# Altium PCB GR_Gold.PcbDoc
Units mil, origin at the board's own origin, x right, y up, seen from the top; angles counter-clockwise.
Board outline 2637.8 x 3661.42 mil, 2 copper layers (Top Layer, Bottom Layer); 49 components, 42 nets, 162 pads, 22 vias.
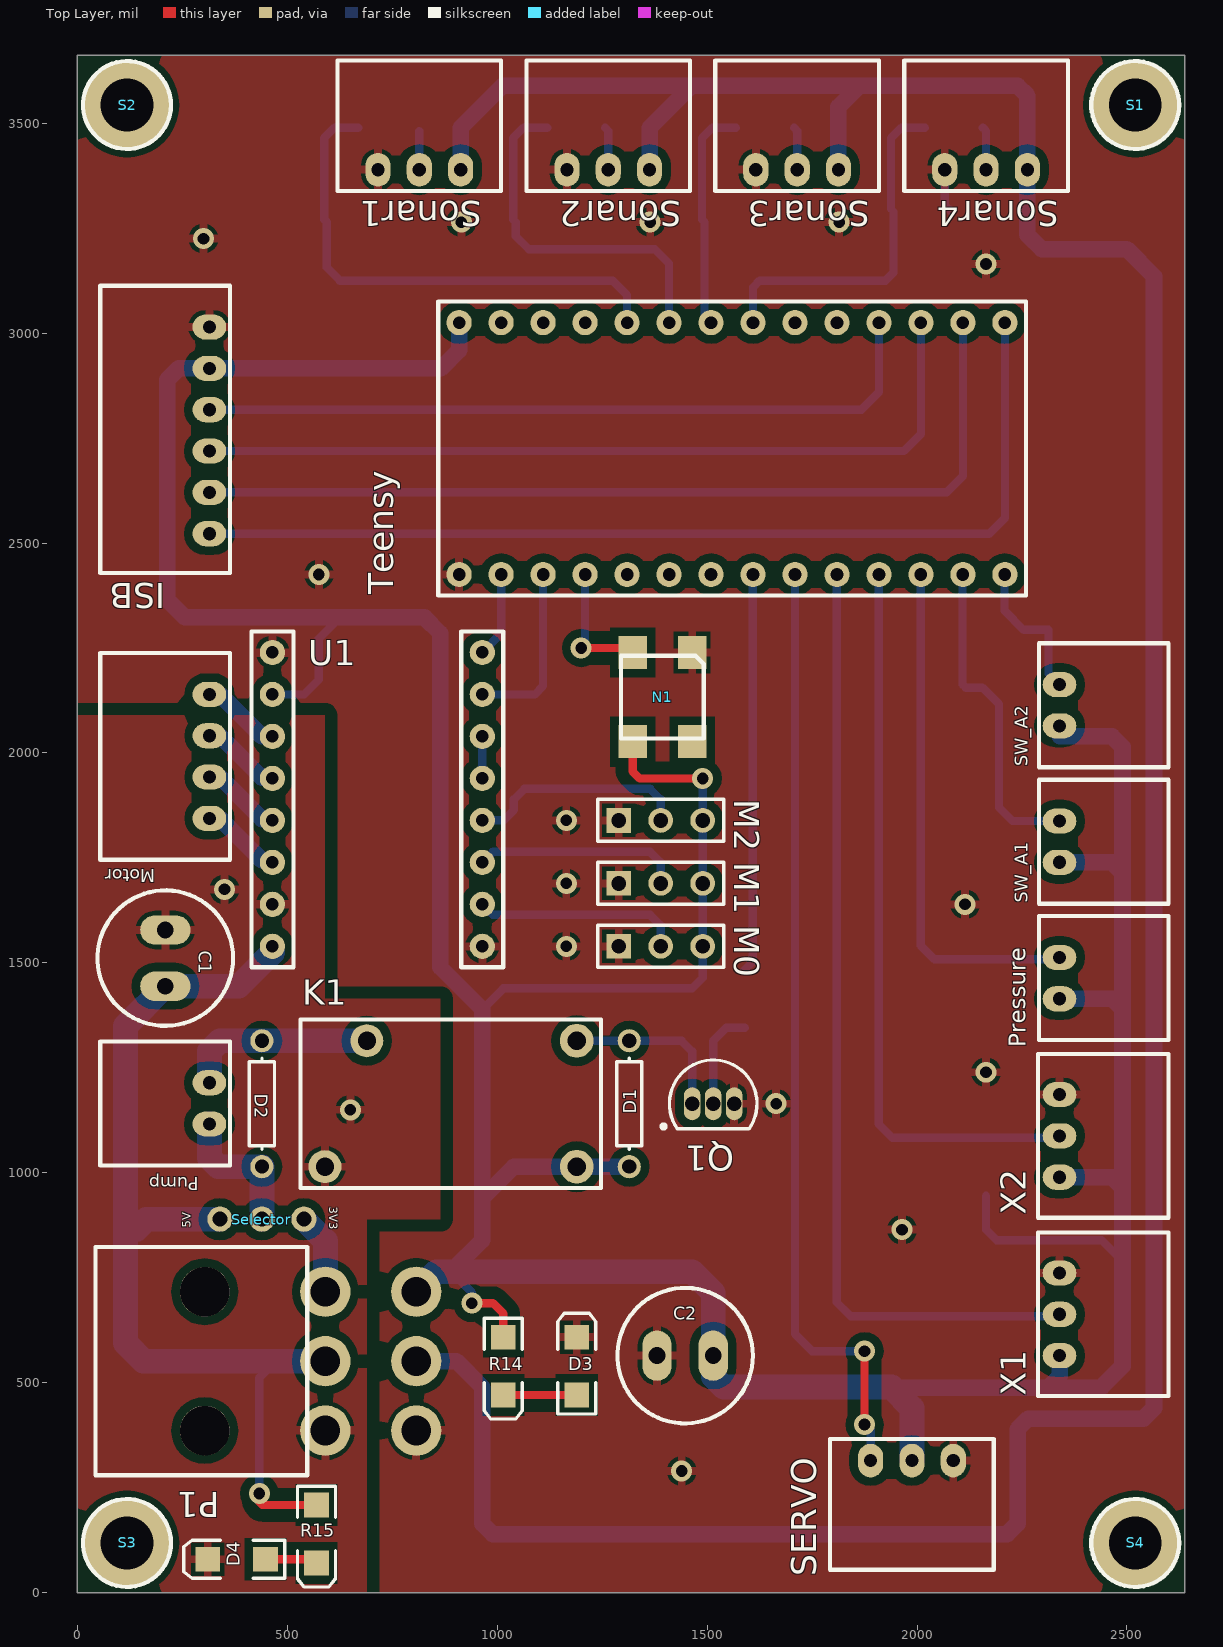
[diagram p0: Top Layer view]
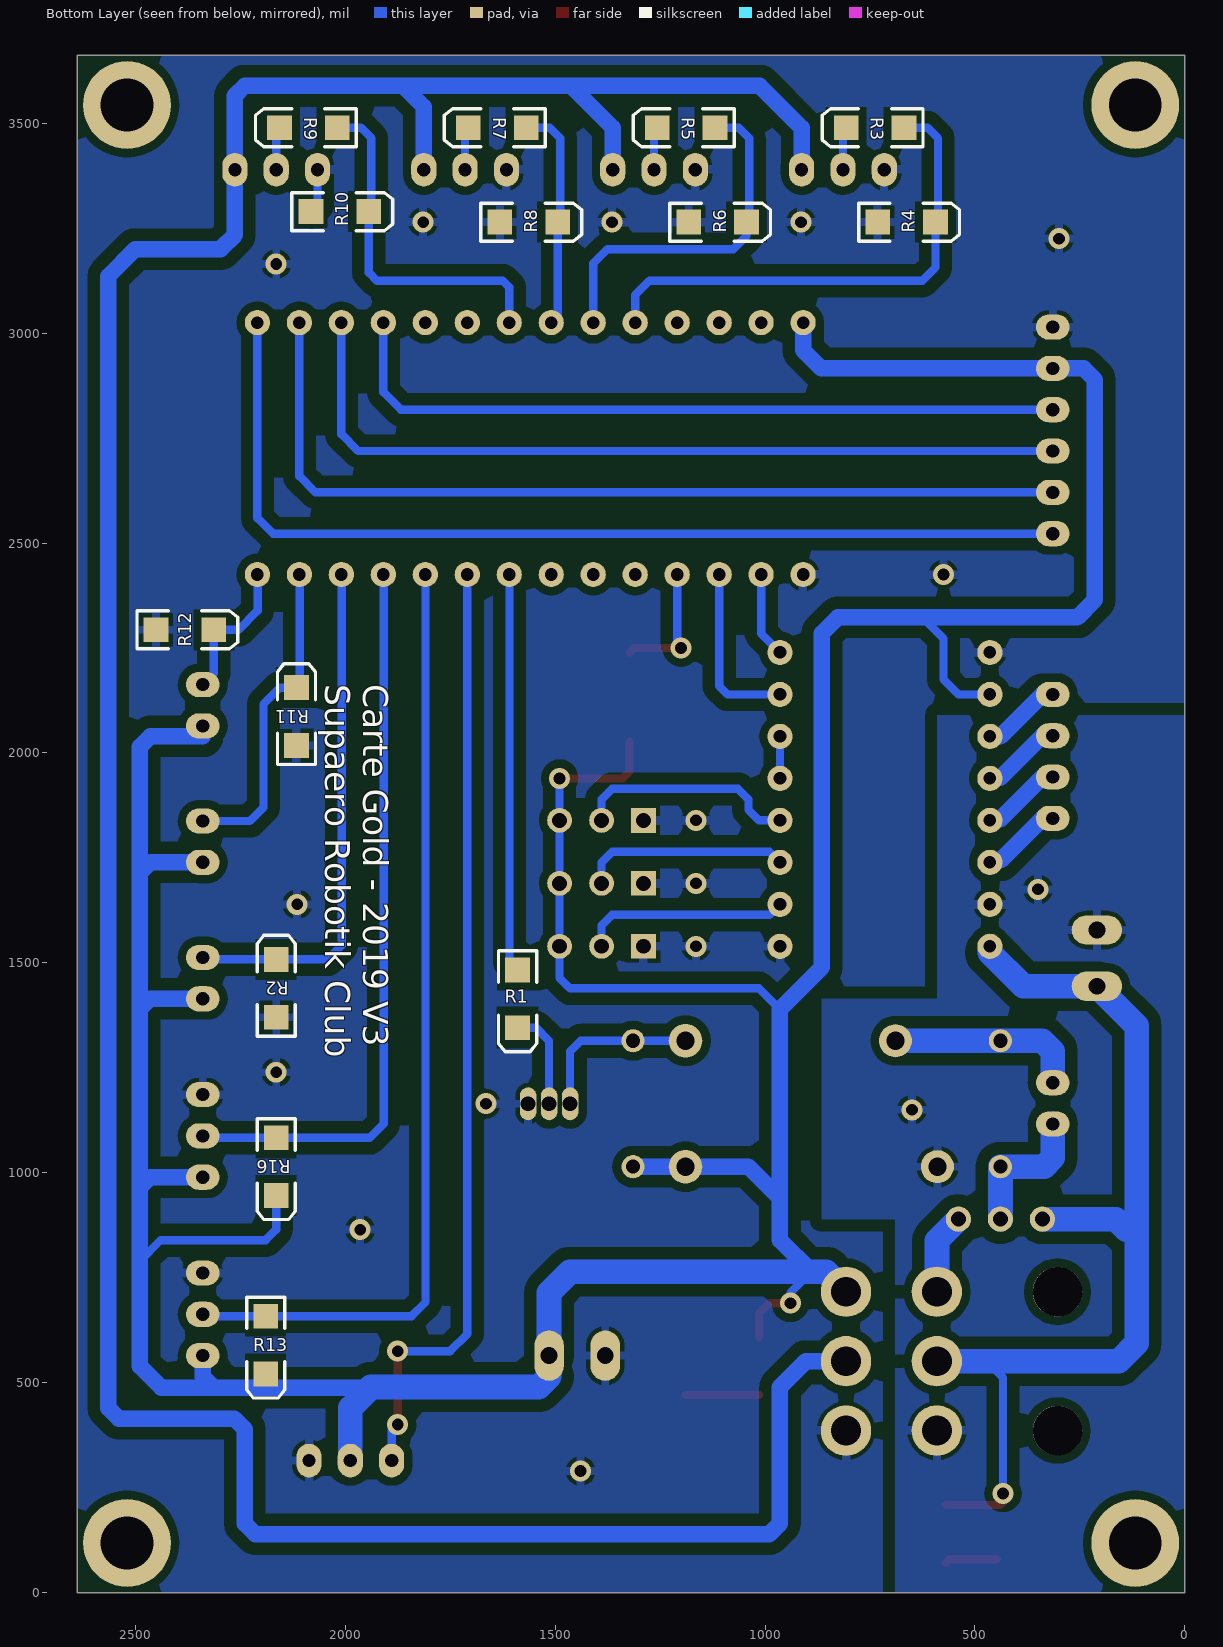
[diagram p1: Bottom Layer view, seen from below]

## Layer stack, top to bottom
Top Solder: solder mask 0.4, Solder Resist, Dk 3.5
Top Layer: signal copper 1.4
Dielectric 1: dielectric 12.6, FR-4, Dk 4.8
Bottom Layer: signal copper 1.4
Bottom Solder: solder mask 0.4, Solder Resist, Dk 3.5

## Board outline
0,0 2637.8,0 2637.8,3661.42 0,3661.42

## Design rules (kind name [scope] priority, off if disabled: settings)
Clearance [All] p1: gap=10 except(20: SMDPad-Poly THPad-Poly Via-Poly; 30: Arc-Poly Track-Poly Fill-Poly Poly-Poly Poly-Region Poly-Text)
PolygonConnect Poly_GNDA [InNet('GND_A')] p1: connectstyle=Relief reliefconductorwidth=20 reliefentries=4 polygonreliefangle="90 Angle" airgapwidth=10
PolygonConnect PolygonConnect_1 [All] p2: connectstyle=Relief reliefconductorwidth=20 reliefentries=4 polygonreliefangle="90 Angle" airgapwidth=10
RoutingVias [All] p1: holewidth=28 width=50 viastyle="Through Hole" minholewidth=28 minwidth=50 maxholewidth=28 maxwidth=50
SolderMaskExpansion [All] p1: expansion=4
Width [All] p1: maxlimit=78.74 minlimit=10 preferedwidth=19.68
30 further rules are at their usual default settings.

## Components (designator, comment, footprint, x,y, rotation, side; value= is the part's Value field where it differs from the comment)
C1 "Cap2" Condensateur 209.37,1444.37 r90 top
C2 "Cap2" Condensateur 1514.37,564.37 r180 top
D1 "Diode" AXIAL-0.3 1314.37,1164.37 r270 top
D2 "Diode" AXIAL-0.3 439.37,1164.37 r270 top
D3 "LED2" 3.2X1.6X1.1 1189.37,539.37 r90 top
D4 "LED2" 3.2X1.6X1.1 379.37,79.37 r180 top
ISB "Header 6H" "MOLEX SPOX 6X1H" 314.37,3014.37 r270 top
K1 "Relay-SPST" Relay 889.37,1164.37 r270 top
M0 "Header 3" HDR1X3 1289.37,1539.37 r0 top
M1 "Header 3" HDR1X3 1289.37,1689.37 r0 top
M2 "Header 3" HDR1X3 1289.37,1839.37 r0 top
Motor "Header 4H" "MOLEX SPOX 4X1H" 314.37,2139.37 r270 top (schematic designator Stepper)
N1 "NeoPixel" Neopixel 1464.37,2239.37 r270 top
P1 "Header 3X2H" MOLEX_MINIFITJR_3X2 590.55,551.18 r270 top
Pressure "Header 2H" "Molex SPOX 2x1H" 2339.37,1414.37 r90 top
Pump "Header 2H" "Molex SPOX 2x1H" 314.37,1214.37 r270 top
Q1 "NPN" TO-226-AA 1514.37,1164.37 r270 top
R1 "Res2" 3.2X1.6X1.1 1589.37,1414.37 r270 bottom
R2 "Res2" 3.2X1.6X1.1 2164.37,1439.37 r90 bottom
R3 "Res2" 3.2X1.6X1.1 737.8,3489.37 r0 bottom
R4 "Res2" 3.2X1.6X1.1 662.8,3264.37 r180 bottom
R5 "Res2" 3.2X1.6X1.1 1187.8,3489.37 r0 bottom
R6 "Res2" 3.2X1.6X1.1 1112.8,3264.37 r180 bottom
R7 "Res2" 3.2X1.6X1.1 1637.8,3489.37 r0 bottom
R8 "Res2" 3.2X1.6X1.1 1562.8,3264.37 r180 bottom
R9 "Res2" 3.2X1.6X1.1 2087.8,3489.37 r0 bottom
R10 "Res2" 3.2X1.6X1.1 2012.8,3289.37 r180 bottom
R11 "Res2" 3.2X1.6X1.1 2116.14,2086.61 r90 bottom
R12 "Res2" 3.2X1.6X1.1 2381.89,2293.31 r180 bottom
R13 "Res2" 3.2X1.6X1.1 2189.37,589.37 r270 bottom
R14 "Res2" 3.2X1.6X1.1 1014.37,539.37 r270 top
R15 "Res2" 3.2X1.6X1.1 569.37,139.37 r270 top
R16 "Res2" 3.2X1.6X1.1 2164.37,1014.37 r270 bottom
S1 "Screw M3" "Screw M3" 2519.69,3543.31 r0 top
S2 "Screw M3" "Screw M3" 118.11,3543.31 r0 top
S3 "Screw M3" "Screw M3" 118.11,118.11 r0 top
S4 "Screw M3" "Screw M3" 2519.69,118.11 r0 top
Selector "Voltage Selector" "VOLTAGE SELECTOR" 439.37,889.37 r90 top
SERVO "Header 3H" "Molex SPOX 3x1H" 1889.37,314.37 r0 top
Sonar1 "Header 3H" "Molex SPOX 3x1H" 912.8,3389.37 r180 top
Sonar2 "Header 3H" "Molex SPOX 3x1H" 1362.8,3389.37 r180 top
Sonar3 "Header 3H" "Molex SPOX 3x1H" 1812.8,3389.37 r180 top
Sonar4 "Header 3H" "Molex SPOX 3x1H" 2262.8,3389.37 r180 top
SW_A1 "Header 2H" "Molex SPOX 2x1H" 2339.37,1739.37 r90 top
SW_A2 "Header 2H" "Molex SPOX 2x1H" 2339.37,2064.37 r90 top
Teensy "Teensy 3.2" teensy 1709.21,2325 r90 top
U1 "DRV8825" DRV8825 964.37,1539.37 r180 top locked (schematic designator "Motor Driver")
X1 "Header 3H" "Molex SPOX 3x1H" 2339.37,564.37 r90 top
X2 "Header 3H" "Molex SPOX 3x1H" 2339.37,989.37 r90 top

## Footprints (in the part's own frame and the unit in brackets; to place one, negate y for a bottom-side part, rotate by r counter-clockwise, add the part's x,y. Pads: shape width x height; smd on the part's side, far side on the other; paste and mask are expansions set on the pad)
3.2X1.6X1.1 [mm] "SMT LED; 2 Flat Leads"
  rect 1.5x1.5 smd: 1(-1.75,0) 2(1.75,0)
  silkscreen extent -2.9,-1.15 3.2,1.15
AXIAL-0.3 [mm] "Axial Device, Thru-Hole; 2 Leads; 0.3 in Pin Spacing"
  round 1.4 hole 0.85: 1(-3.81,0) 2(3.81,0)
  silkscreen extent -2.77,-0.76 2.77,0.76
Condensateur [mil]
  oval 70x120 hole 40: 1(0,0) 2(133.86,0)
  silkscreen extent -94,-161 228,161, body extent -93,-160 227,160, height 500
DRV8825 [mil] "Stepper Driver"
  round 60 hole 30: 1(0,0) 2(0,-100) 3(0,-200) 4(0,-300) 5(0,-400) 6(0,-500) 7(0,-600) 8(0,-700) 9(500,-700) 10(500,-600) 11(500,-500) 12(500,-400) 13(500,-300) 14(500,-200) 15(500,-100) 16(500,0)
  silkscreen extent -50,-750 550,50
HDR1X3 [mm] "Connector; Header; 3 Position"
  rect 1.5x1.5 hole 0.9: 1(0,0)
  round 1.5 hole 0.9: 2(2.54,0) 3(5.08,0)
  silkscreen extent -1.27,-1.27 6.35,1.27
"Molex SPOX 2x1H" [mil] "Prise CI, Molex, 3 Contacts, 1 rangée, entraxe 2.5mm, 3A, Coudé, ref 22-03-5035"
  oval 60x80 hole 31.5: 1(0,0) 2(98.43,0)
  silkscreen extent -98,-260 197,49, body extent -98,-262 193,49, height 193
"Molex SPOX 3x1H" [mil] "Prise CI, Molex, 3 Contacts, 1 rangée, entraxe 2.5mm, 3A, Coudé, ref 22-03-5035"
  oval 60x80 hole 31.5: 1(0,0) 2(98.43,0) 3(196.85,0)
  silkscreen extent -96,-260 293,51, body extent -96,-260 293,51, height 193
"MOLEX SPOX 4X1H" [mil] "Prise CI, Molex, 3 Contacts, 1 rangée, entraxe 2.5mm, 3A, Coudé, ref 22-03-5035"
  oval 60x80 hole 31.5: 1(0,0) 2(98.43,0) 3(196.85,0) 4(295.28,0)
  silkscreen extent -98,-260 394,49, body extent -98,-262 390,49, height 193
"MOLEX SPOX 6X1H" [mil] "MOLEX SPOX 6X1H, 22-05-7065"
  oval 60x80 hole 31.5: 1(0,0) 2(98.43,0) 3(196.85,0) 4(295.28,0) 5(393.7,0) 6(492.13,0)
  silkscreen extent -98,-260 586,49, body extent -95,-260 590,51, height 193
MOLEX_MINIFITJR_3X2 [mm] "MOLEX_MINIFITJR_3X2, 39-30-1060"
  round 3.048 hole 1.8: 1(-4.2,5.5) 2(-4.2,0) 3(0,5.5) 4(0,0) 5(4.2,5.5) 6(4.2,0)
  round 3 hole 3 unplated: 10(-4.2,-7.3) 11(4.2,-7.3)
  silkscreen extent -6.9,-13.9 6.9,-1.1, body extent -6.9,-13.9 7.3,6.04, height 11.41
Neopixel [mm]
  rect 2x1.7 smd: 1(0,0) 2(0,-3.6) 3(5.4,-3.6) 4(5.4,0)
  silkscreen extent 0.2,-4.3 5.2,0.7, body extent 0.19,-4.33 5.19,0.67, height 2
Relay [mm] "SPST-NO Relay"
  round 2 hole 1.1: 1(3.81,-7.62) 2(-3.81,-5.08)
  round 2.032 hole 1.1: 3(-3.81,7.62) 4(3.81,7.62)
  silkscreen extent -5.09,-9.09 5.09,9.09, body extent -5.08,-9.14 5.08,9.14, height 15
"Screw M3" [mm] "M3 iso Screw"
  round 5.32 hole 3.2 unplated: 0(0,0)
  silkscreen extent -2.66,-2.66 2.66,2.66
teensy [mil] "Teensy 3.2"
  round 60 hole 30: 0(100,700) 1(100,600) 2(100,500) 3(100,400) 4(100,300) 5(100,200) 6(100,100) 7(100,0) 8(100,-100) 9(100,-200) 10(100,-300) 11(100,-400) 12(100,-500) 13(700,-500) 14(700,-400) 15(700,-300) 16(700,-200) 17(700,-100) 18(700,0) 19(700,100) 20(700,200) 21(700,300) 22(700,400) 23(700,500) 41(700,600) 42(700,700) 43(700,800) 44(100,800)
  silkscreen extent 50,-550 750,850, body extent 48,-550 752,907, height 505
TO-226-AA [mm] "TO, Flat Index; 3 In-Line, Axial Leads; Body Dia. 4.8mm; Leads 0.55 x 0.51 mm (max)"
  oval 2x1 hole 0.9: 1(0,-1.27) 2(0,0) 3(0,1.27)
  silkscreen extent -2.65,-3.13 1.52,2.65, body extent -2.65,-2.66 1.52,2.66, height 5.33
"VOLTAGE SELECTOR" [mil] "3 Pads for Voltage Selection"
  round 60 hole 35.43: 1(0,100) 2(0,-100) 3(0,0)
  body extent -50,-150 50,150, height 340

## Part data
C1 C2: "Capacitor"
D1 D2: "Default Diode"
D3 D4: "Typical RED, GREEN, YELLOW, AMBER GaAs LED"
ISB: "Header, 6-Pin, Right Angle"
K1: "Single-Pole Single-Throw Relay"
M0 M1 M2: "Header, 3-Pin"
Motor: "Header, 4-Pin, Right Angle"
P1: "Header, 3-Pin, Dual row, Right Angle"
Pressure Pump SW_A1 SW_A2: "Header, 2-Pin, Right Angle"
Q1: "NPN Bipolar Transistor"
R1 R2 R3 R4 R5 R6 R7 R8 R9 R10 R11 R12 R13 R14 R15 R16: "Resistor"
Selector: "Selection of voltage by soldering pads"
SERVO Sonar1 Sonar2 Sonar3 Sonar4 X1 X2: "Header, 3-Pin, Right Angle"
Teensy: library part teensy3.2
U1: "Stepper Driver Module"

## Via types
v1: diameter 50, hole 28, Top Layer to Bottom Layer, 22 vias

## Nets (pads, with @x,y where several pads share a name; then routed paths per layer and width w, separated by ;. In a path a pad name is that pad's centre, name@x,y a point inside that pad or via, vN(x,y) a via of type N, cw(c..) or ccw(c..) an arc to the next point about the centre after c; other vN are vias at no path point)
3V3_A: P1.2 Selector.2 | length 194
  Bottom Layer w59.06: Selector.2 590.55,838.19 P1.2
5V_L: C2.1 D1.2 ISB.2 K1.4 M0.3 M1.3 M2.3 N1.3 P1.1 Pressure.1 R13.2 R14.1 R16.2 SERVO.2 SW_A1.1 SW_A2.1 Teensy.43 U1.10 X1.1 X2.1 | length 10569.9
  Top Layer w19.68: v1(939.37,689.37) 989.37,689.37 1014.37,664.37 R14.1 ; N1.3 1322.64,1956.1 1339.37,1939.37 v1(1489.37,1939.37)
  Bottom Layer w19.68: U1.10 539.37,2139.37 575,2175 575,2272.83 625,2322.83 ; 889.37,764.37 939.37,714.37 v1(939.37,689.37) ; 964.37,1389.37 1014.37,1439.37 1464.37,1439.37 1489.37,1464.37 M0.3 M1.3 M2.3 v1(1489.37,1939.37) ; 1939.37,487.8 1939.37,489.37 ; 2014.37,487.8 2014.37,489.37 ; R16.2 2164.37,864.37 2189.37,839.37 2439.37,839.37 2489.37,789.37 ; 2314.37,487.8 2314.37,489.37 ; 2437.8,487.8 2439.37,489.37
  Bottom Layer w39.37: 889.37,764.37 964.37,839.37 964.37,939.37 ; Teensy.43 909.21,2959.21 865.94,2915.94 ISB.2 240.94,2915.94 214.37,2889.37 214.37,2364.37 255.91,2322.83 625,2322.83 826.77,2322.83 864.37,2285.24 864.37,1489.37 964.37,1389.37 964.37,939.37 ; D1.2 K1.4 1039.37,1014.37 964.37,939.37 ; C2.1@1514.37,514.37 C2.1 ; 1939.37,487.8 2014.37,487.8 2314.37,487.8 2437.8,487.8 ; 2314.37,489.37 2339.37,514.37 X1.1 ; X2.1 2464.37,989.37 2489.37,964.37 ; Pressure.1 2464.37,1414.37 2489.37,1389.37 ; SW_A1.1 2464.37,1739.37 2489.37,1714.37 ; SW_A2.1@2339.37,2039.37 2464.37,2039.37 2489.37,2014.37 2489.37,1389.37 ; 2439.37,489.37 2489.37,539.37 2489.37,789.37 2489.37,964.37 ; 2489.37,964.37 2489.37,1389.37
  Bottom Layer w59.06: P1.1 854.92,764.37 889.37,764.37 1464.37,764.37 1514.37,714.37 C2.1 ; C2.1@1514.37,514.37 1539.37,489.37 1939.37,489.37 ; 1939.37,487.8 1987.8,439.37 SERVO.2
12V_A: C1.1 P1.4 R15.1 Selector.1 U1.16 | length 2397
  Top Layer w19.68: v1(433.07,236.22) 433.07,215.67 440.47,208.27 R15.1
  Bottom Layer w19.68: 114.37,864.37 139.37,864.37 ; v1(433.07,236.22) 433.07,511.81 472.44,551.18
  Bottom Layer w59.05: U1.16@464.37,1524.37 384.37,1444.37 C1.1 114.37,1349.37 114.37,864.37 114.37,594.29 157.48,551.18 P1.4@589.37,551.18
  Bottom Layer w59.06: 139.37,864.37 164.37,889.37 Selector.1
15V: P1.3 Sonar1.1 Sonar2.1 Sonar3.1 Sonar4.1 | length 7708.1
  Bottom Layer w39.37: P1.3 902.56,551.18 964.37,489.37 964.37,164.37 989.37,139.37 2214.37,139.37 2239.37,164.37 2239.37,389.37 2264.37,414.37 2539.37,414.37 2564.37,439.37 2564.37,3135.63 2500,3200 2296.85,3200 2262.8,3234.06 Sonar4.1 2262.8,3565.94 2239.37,3589.37 1462.8,3589.37 ; Sonar1.1 912.8,3489.37 1012.8,3589.37 1462.8,3589.37 ; Sonar2.1 1362.8,3489.37 1462.8,3589.37 ; Sonar3.1 1812.8,3539.37 1862.8,3589.37
GND_A: C1.2 D4.2 K1.1 P1.6 U1.15
  other v1: 650,1150 350,1675
GND_L: C2.2 D3.2 ISB.1 M0.1 M1.1 M2.1 N1.1 P1.5 Q1.3 R2.1 R4.1 R6.1 R8.1 R10.1 R11.1 R12.1 SERVO.3 Sonar1.3 Sonar2.3 Sonar3.3 Sonar4.3 Teensy.44 U1.1 U1.9 X1.3 X2.3 | length 106.5
  Bottom Layer w19.68: Sonar4.3 2065.94,3305.12 R10.1
  other v1: 1439.37,289.37 1964.37,864.37 1664.37,1164.37 2164.37,1239.37 1164.37,1539.37 2114.37,1639.37 1164.37,1689.37 1164.37,1839.37 575,2425 2164.37,3164.37 300,3225 914.37,3264.37 1364.37,3264.37 1814.37,3264.37
NetD1_1: D1.1 K1.3 Q1.1 | length 410.4
  Bottom Layer w19.68: K1.3 D1.1 1439.37,1314.37 1464.37,1289.37 Q1.1
NetD2_1: D2.1 K1.2 Pump.1 | length 460.4
  Bottom Layer w59.05: Pump.1 314.37,1289.37 339.37,1314.37 K1.2
NetD2_2: D2.2 Pump.2 Selector.3 | length 339.1
  Bottom Layer w59.06: Pump.2 314.37,1035.63 335.63,1014.37 D2.2 Selector.3
NetD3_1: D3.1 R14.2 | length 175
  Top Layer w19.68: R14.2 D3.1
NetD4_1: D4.1 R15.2 | length 124.8
  Top Layer w19.68: D4.1 560.47,79.37 R15.2
NetISB_3: ISB.3 Teensy.16 | length 1777.9
  Bottom Layer w19.68: ISB.3 1867.52,2817.52 1909.21,2859.21 Teensy.16
NetISB_4: ISB.4 Teensy.15 | length 1977.2
  Bottom Layer w19.68: ISB.4 1969.09,2719.09 2009.21,2759.21 Teensy.15
NetISB_5: ISB.5 Teensy.14 | length 2176.6
  Bottom Layer w19.68: ISB.5 2070.67,2620.67 2109.21,2659.21 Teensy.14
NetISB_6: ISB.6 Teensy.13 | length 2375.9
  Bottom Layer w19.68: ISB.6 2172.24,2522.24 2209.21,2559.21 Teensy.13
NetM0_2: M0.2 U1.2 | length 495.7
  Bottom Layer w19.68: U1.2 989.37,1614.37 1364.37,1614.37 1389.37,1589.37 M0.2
NetM1_2: M1.2 U1.3 | length 495.7
  Bottom Layer w19.68: U1.3 989.37,1764.37 1364.37,1764.37 1389.37,1739.37 M1.2
NetM2_2: M2.2 U1.4 | length 531.1
  Bottom Layer w19.68: U1.4 1014.37,1839.37 1039.37,1864.37 1039.37,1889.37 1064.37,1914.37 1364.37,1914.37 1389.37,1889.37 M2.2
NetMotor_1: Motor.1 U1.11 | length 191.4
  Bottom Layer w39.37: Motor.1 339.37,2139.37 439.37,2039.37 U1.11
NetMotor_2: Motor.2 U1.12 | length 191.4
  Bottom Layer w39.37: Motor.2 339.37,2040.94 439.37,1940.94 U1.12@464.37,1940.94
NetMotor_3: Motor.3 U1.13 | length 195.9
  Bottom Layer w19.68: U1.13@461.22,1842.52 U1.13
  Bottom Layer w39.37: Motor.3 339.37,1942.52 439.37,1842.52 U1.13@464.37,1842.52
NetMotor_4: Motor.4 U1.14 | length 198.1
  Bottom Layer w19.68: U1.14@459.65,1744.09 U1.14
  Bottom Layer w39.37: Motor.4 339.37,1844.09 439.37,1744.09 U1.14@464.37,1744.09
NetN1_3: N1.2 Teensy.2 | length 305.9
  Top Layer w19.68: v1(1200,2250) 1312.01,2250 N1.2
  Bottom Layer w19.68: v1(1200,2250) 1209.21,2259.21 Teensy.2
NetPressure_2: Pressure.2 R2.2 Teensy.10 | length 1205.1
  Bottom Layer w19.68: Teensy.10@2008.5,2400.13 2008.5,1541.5 2041.73,1508.27 R2.2 2334.84,1508.27 Pressure.2
NetQ1_2: Q1.2 R1.2 | length 237.9
  Bottom Layer w19.68: Q1.2 1514.37,1314.37 1545.47,1345.47 R1.2
NetR1_1: R1.1 Teensy.6 | length 924.8
  Bottom Layer w19.68: R1.1 1608.5,1502.39 Teensy.6@1608.5,2400.13
NetR3_1: R3.1 R4.2 Teensy.22 | length 1210.4
  Bottom Layer w19.68: R3.1 612.8,3489.37 587.8,3464.37 587.8,3270.47 R4.2 593.9,3156.1 625,3125 1275,3125 1309.21,3090.79 Teensy.22
NetR3_2: R3.2 Sonar1.2 | length 92.3
  Bottom Layer w19.68: Sonar1.2 R3.2@814.37,3481.69
NetR5_1: R5.1 R6.2 Teensy.21 | length 860.4
  Bottom Layer w19.68: R5.1 1062.8,3489.37 1037.8,3464.37 1037.8,3270.47 R6.2 1043.9,3231.1 1075,3200 1375,3200 1409.21,3165.79 Teensy.21
NetR5_2: R5.2 Sonar2.2 | length 103.2
  Bottom Layer w19.68: R5.2 1264.37,3481.69 Sonar2.2
NetR7_1: R7.1 R8.2 Teensy.20 | length 539.7
  Bottom Layer w19.68: Teensy.20 1493.9,3040.32 R8.2 1487.8,3270.47 1487.8,3464.37 1512.8,3489.37 R7.1
NetR7_2: R7.2 Sonar3.2 | length 103.2
  Bottom Layer w19.68: R7.2 1714.37,3481.69 Sonar3.2
NetR9_1: R9.1 R10.2 Teensy.19 | length 839.1
  Bottom Layer w19.68: Teensy.19 1609.21,3109.21 1625,3125 1925,3125 1943.9,3143.9 R10.2 ; R10.2@1937.8,3295.47 1937.8,3464.37 1962.8,3489.37 R9.1
NetR9_2: R9.2 Sonar4.2 | length 103.2
  Bottom Layer w19.68: R9.2 2164.37,3481.69 Sonar4.2
NetR11_2: R11.2 SW_A1.2 Teensy.11 | length 746.8
  Bottom Layer w19.68: Teensy.11@2108.5,2400.13 2108.5,2163.16 R11.2 2155.51,2155.51 2194.88,2116.14 2194.88,1870.08 2227.17,1837.8 SW_A1.2
NetR12_2: R12.2 SW_A2.2 Teensy.12 | length 326.1
  Bottom Layer w19.68: Teensy.12@2208.5,2400.13 2208.5,2338.75 2253.94,2293.31 R12.2 2312.99,2189.17 SW_A2.2
NetR13_1: R13.1 Teensy.8 X1.2 | length 2255.1
  Bottom Layer w19.68: Teensy.8@1808.5,2400.13 1808.5,691.5 1841.73,658.27 R13.1 2334.84,658.27 X1.2
NetR16_1: R16.1 Teensy.9 X2.2 | length 1730.1
  Bottom Layer w19.68: Teensy.9@1908.5,2400.13 1908.5,1116.5 1941.73,1083.27 R16.1 2334.84,1083.27 X2.2
NetSERVO_1: SERVO.1 Teensy.7 | length 2233.9
  Top Layer w19.68: v1(1875,400) v1(1875,575)
  Bottom Layer w19.68: Teensy.7@1708.5,2400.13 1709.21,2399.41 1709.21,615.79 1750,575 v1(1875,575) ; v1(1875,400) 1889.37,385.63 SERVO.1
NetTeensy_0: Teensy.0 U1.8 | length 204.2
  Bottom Layer w19.68: U1.8 1009.21,2284.21 Teensy.0
NetTeensy_1: Teensy.1 U1.7 | length 418.8
  Bottom Layer w19.68: U1.7 1089.37,2139.37 1109.21,2159.21 Teensy.1
NetU1_5: U1.5 U1.6 | length 100
  Bottom Layer w19.68: U1.5 U1.6
pads on no net: N1.4 P1.10 P1.11 S1.0 S2.0 S3.0 S4.0 Teensy.3 Teensy.4 Teensy.5 Teensy.17 Teensy.18 Teensy.23 Teensy.41 Teensy.42

## Polygon pours and split planes (outlines as drawn)
GND_L on Top Layer "Top_GND_L" (solid, pour order 7): 2637.8,0 2637.8,3661.42 0,3661.42 0,0
GND_A on Top Layer "Top_GND_A" (solid, pour order 1): 689.37,0 689.37,889.37 864.37,889.37 864.37,1414.37 589.37,1414.37 589.37,2089.37 0,2089.37 0,0
GND_L on Bottom Layer "Bottom_GND_L" (solid, pour order 5): 2637.8,0 2637.8,3661.42 0,3661.42 0,0
GND_A on Bottom Layer "Bottom_GND_A" (solid, pour order 0): 689.37,0 689.37,889.37 864.37,889.37 864.37,1414.37 589.37,1414.37 589.37,2089.37 0,2089.37 0,0

## Silkscreen, mask and mechanical layers (free items; w line width, h text height)
Bottom Overlay:
  text "Carte Gold - 2019 V3 / Supaero Robotik Club" at 2047.24,2163.19 h60 r90
Mechanical 2:
  the board outline again, w10

## Dimensions
0,0 to 2637.8,0 on Mechanical 15
2637.8,3661.42 to 2755.91,0 on Mechanical 15

## Text inside footprints (layer, text, board x,y; h text height)
Selector: Top Overlay "3V3" at 599.37,919.37 h20 r270; Top Overlay "5V" at 269.37,869.37 h20 r90